# Altium PCB VA_HUB_PCB.PcbDoc (part 12 of 12)
Units mil, origin at the board's own origin, x right, y up, seen from the top; angles counter-clockwise.
Board outline 4408 x 3619 mil, 8 copper layers (Top Layer, Routing 1, Routing 2, Power Plane, GND Plane, Routing 3, Routing 4, Bottom Layer), stack 85.156 mil thick; 569 components, 440 nets, 2911 pads, 1518 vias.
Unrouted connection lines stored in the file: 46.
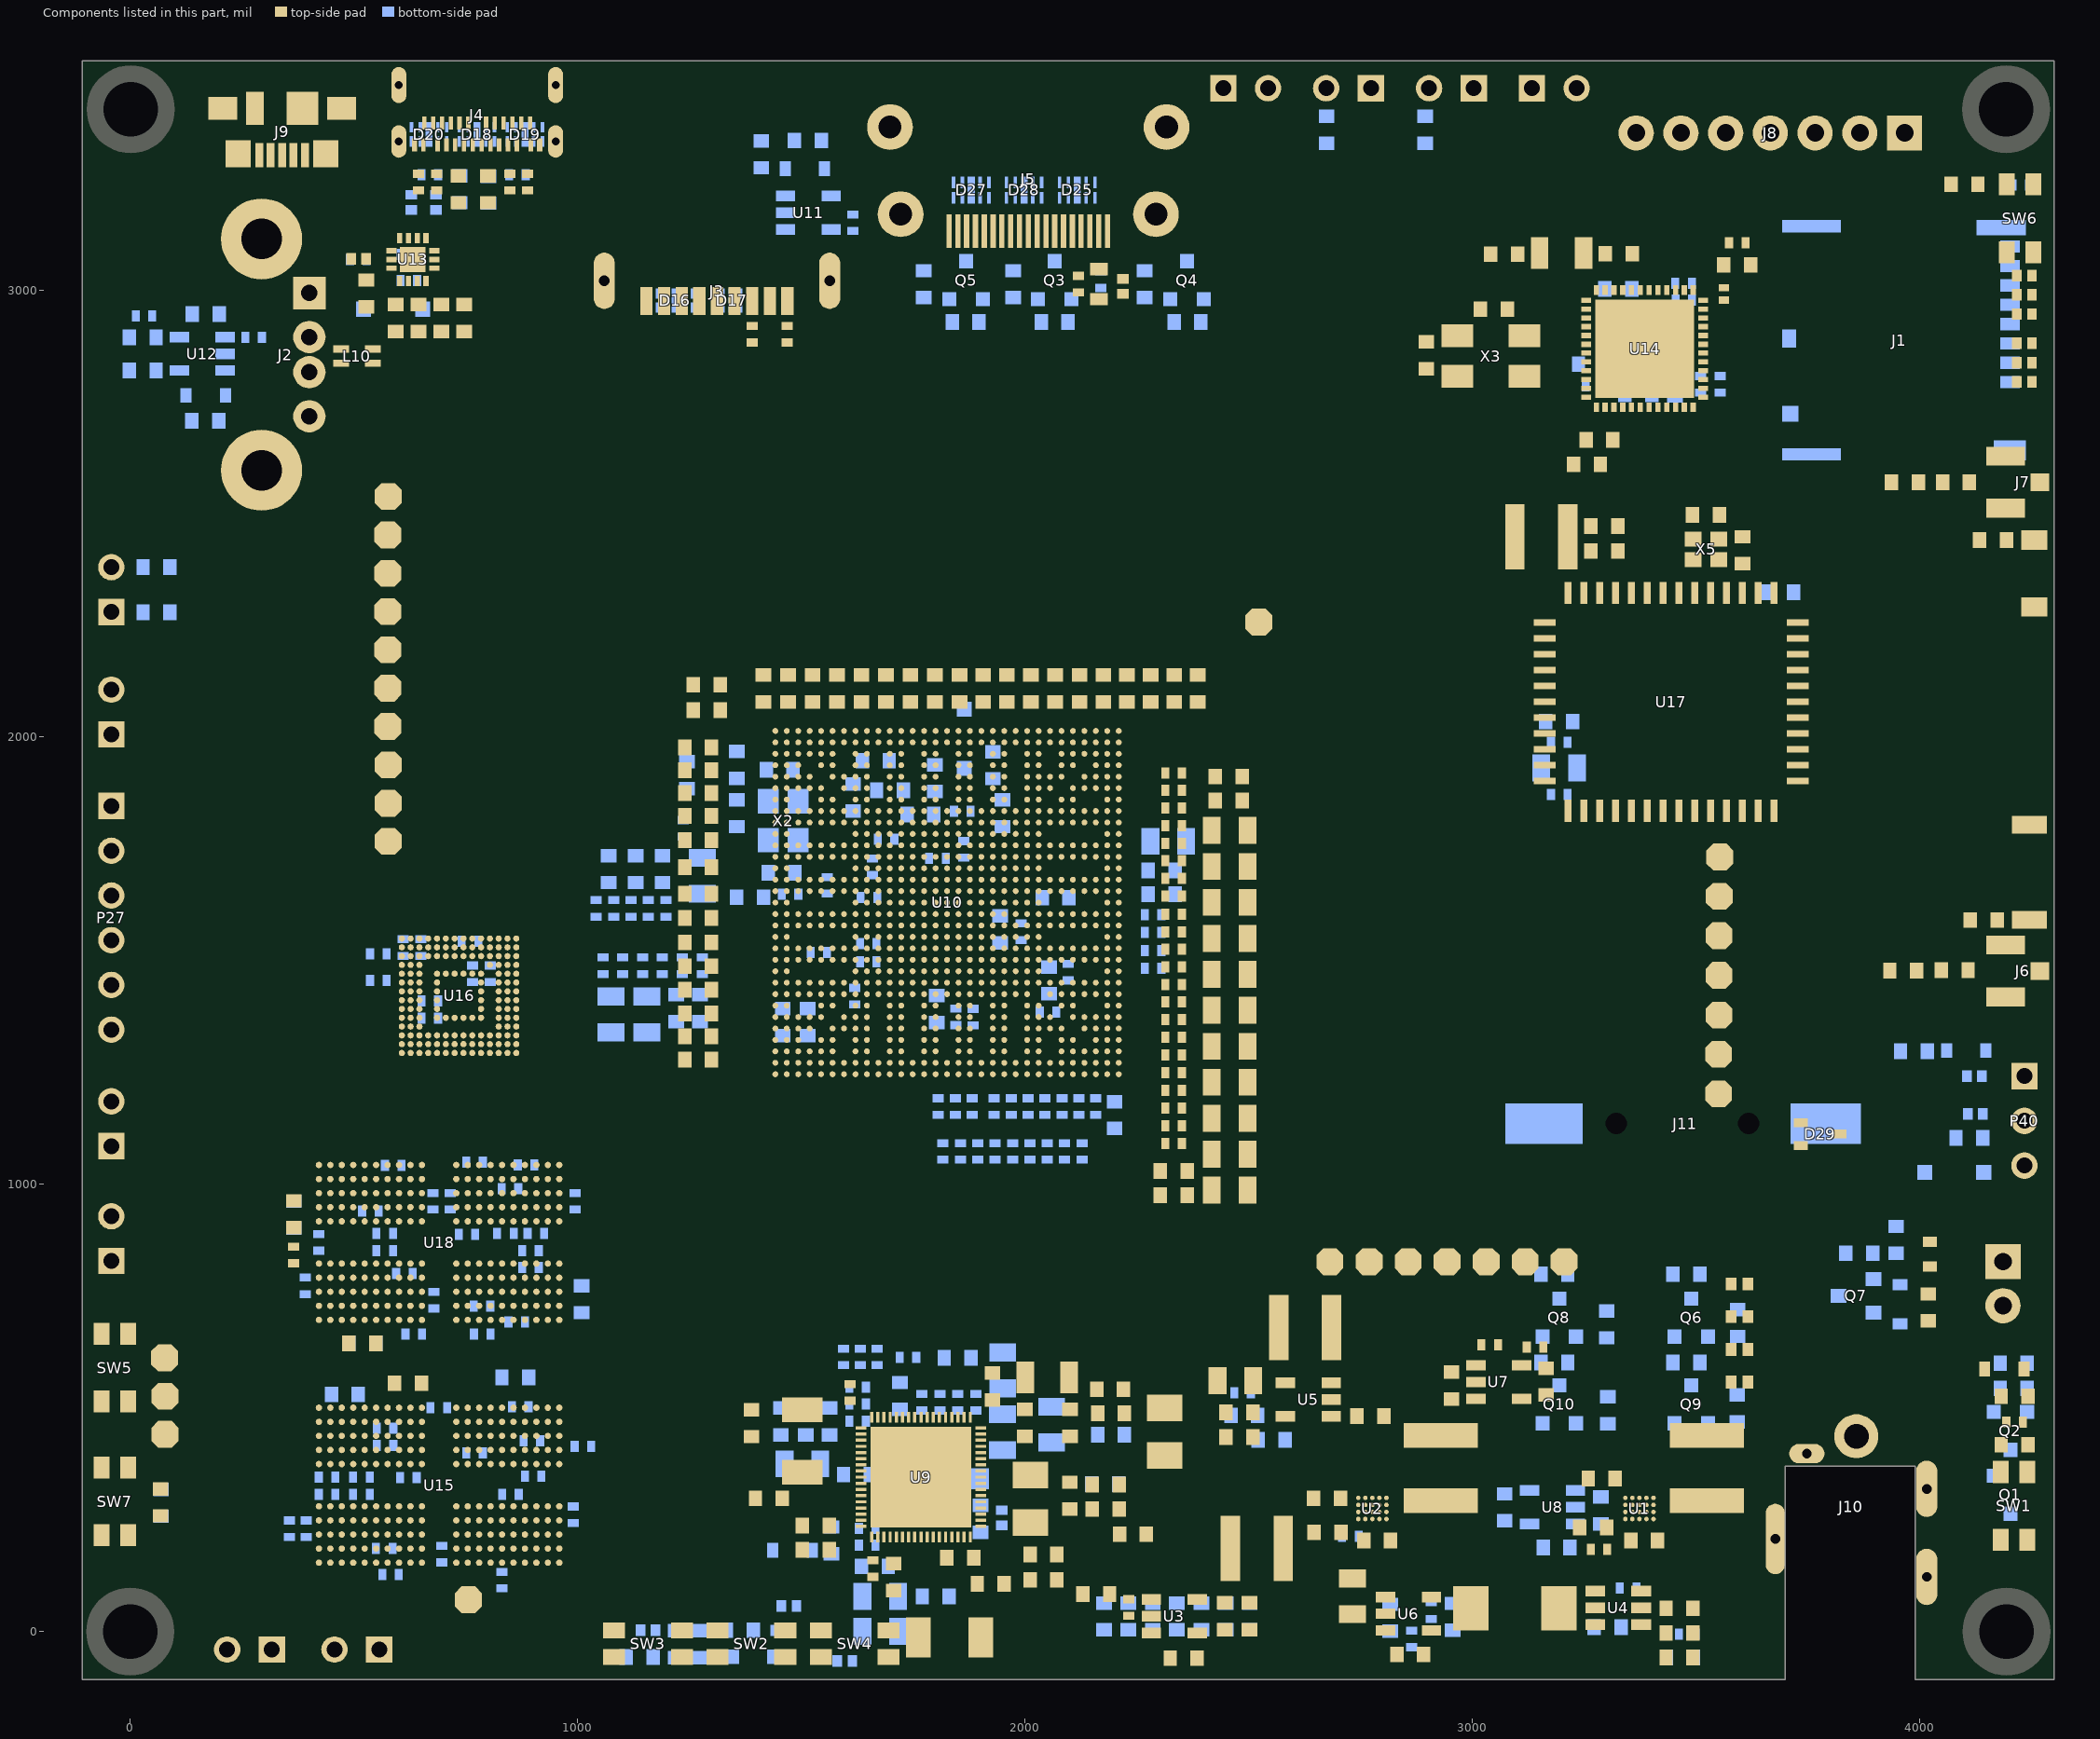
[diagram p15: the components of this part, seen from the top]

## Silkscreen, mask and mechanical layers (free items; w line width, h text height)
Top Overlay:
  drawing of 3067 lines, arcs and shapes, not listed
  text "DSP" at 2390.49,3335.99 h55
  text "BOOT1_" at 2621.16,3335.99 h55
  text "BOOT0_" at 2849.82,3335.99 h55
  text "DEBUG" at 3081.82,3335.99 h60
  text "#" at 4054.82,3268.41 h55
  text "DATA" at 3316.32,3239.99 h60
  text "*" at 612.38,3181.09 h65 r270
  text "*" at 652.38,3181.09 h65 r270
  text "*" at 815.82,3180.92 h65 r270
  text "*" at 856.56,3181 h65 r270
  text "$" at 3631,3093.41 h38
  text "*" at 2087.17,2954.1 h65 r270
  text "*" at 1358.56,2842 h65 r270
  text "*" at 1436.56,2842 h65 r270
  text "#" at 3200.82,2646.41 h55
  text "#" at 3172.82,2592.41 h55
  text "VCC_EFUSE" at 617.3,2509 h60
  text "VCC_1V8" at 616.2,2422.82 h60
  text "#" at 3355.41,2397.43 h55
  text "ZERO CARBON FOOTPRINT" at 1713,2374 h35
  text "MCU_JTAG" at 12.61,2372.59 h60
  text "NetP34_1" at 616.46,2334.82 h60
  text "NetP35_1" at 617.67,2247.82 h60
  text "DDR0_OTD1" at 2561.64,2228.18 h60
  text "VCCA1V8_HDMI" at 617.39,2166.82 h60
  text "DFT_JTAG" at 13.6,2098.84 h60
  text "VCCA0V9_HDMI" at 617.39,2079.82 h60
  text "VCC_3V0" at 617.45,1992.82 h60
  text "SDMMC0_DET_L" at 618.34,1909.82 h60
  text "$" at 2278.82,1908.24 h38
  text "*" at 2251.51,1869.94 h65 r270
  text "SPI_HEADER" at 13.27,1838.73 h60
  text "*" at 2251.51,1830.94 h65 r270
  text "VDD_CPU_L" at 618.09,1822.82 h60
  text "*" at 2251.51,1790.94 h65 r270
  text "@" at 2530,1777.29 h60
  text "*" at 2251.51,1751.94 h65 r270
  text "VCC_DDR" at 618.45,1737.82 h60
  text "*" at 2251.51,1712.94 h65 r270
  text "VCC_3V3_SYS" at 3128.97,1702.53 h60
  text "@" at 2530,1696.29 h60
  text "*" at 2251.51,1673.94 h65 r270
  text "*" at 2251.51,1634.94 h65 r270
  text "@" at 2530,1616.29 h60
  text "VCC_1V8" at 3226.26,1614.53 h60
  text "*" at 2251.51,1592.94 h65 r270
  text "#" at 1211.71,1557.7 h55 r180
  text "*" at 2251.51,1553.94 h65 r270
  text "@" at 2530,1534.29 h60
  text "VCC_5V" at 3225.49,1525.82 h60
  text "*" at 2251.51,1514.94 h65 r270
  text "$" at 2278.82,1474.24 h38
  text "@" at 2530,1453.29 h60
  text "VDD_CENTER" at 3137.09,1438.82 h60
  text "*" at 2251.51,1435.94 h65 r270
  text "*" at 2251.51,1396.94 h65 r270
  text "@" at 2530,1373.29 h60
  text "*" at 2251.38,1357.82 h65 r270
  text "VDD_LOG" at 3225.26,1347.53 h60
  text "*" at 2251.25,1317.89 h65 r270
  text "@" at 2530,1293.29 h60
  text "*" at 2251.25,1278.89 h65 r270
  text "VDD_CPU_B" at 3176.65,1263.82 h60
  text "*" at 2251.25,1238.89 h65 r270
  text "UART_DEBUG" at 3806.06,1233.82 h60
  text "@" at 2530,1213.29 h60
  text "$" at 2278.82,1198.24 h38
  text "AP_JTAG" at 12.7,1179.36 h60
  text "NetP32_1" at 3226.67,1170 h60
  text "*" at 2251.51,1159.94 h65 r270
  text "@" at 2530,1132.29 h60
  text "*" at 2251.25,1119.89 h65 r270
  text "@" at 2530,1051.29 h60
  text "@" at 2530,970.29 h60
  text "FAN" at 4049.82,930.74 h60
  text "DFT_JTAG" at 12.6,922.34 h60
  text "DDR1_OTD1" at 2798.82,866.64 h60 r90
  text "VCCA_0V9" at 2973.1,867.14 h60 r90
  text "VCC_RTC" at 3147.81,866.5 h60 r90
  text "VCC3V3_S5" at 3234.82,866.47 h60 r90
  text "VCCA3V0_CODEC" at 2885.82,865.64 h60 r90
  text "VDD_GPU" at 3063.1,866.26 h60 r90
  text "DDR0_OTD0" at 2710.82,863.66 h60 r90
  text "GPIO-A1" at 3323.01,748.25 h60
  text "RED" at 3323.82,679.67 h60
  text "$" at 3076.9,629.44 h38
  text "$" at 3178.11,623.78 h38
  text "WORK" at 3323.52,606.82 h60
  text "#" at 1894.82,604.23 h55 r180
  text "#" at 2203.41,599.82 h55 r270
  text "DDR1_ODT0" at 115.83,583.42 h60
  text "$" at 1594.46,575.02 h38
  text "YELLOW" at 3317.32,531.82 h60
  text "EMC_CLK" at 116.32,497 h60
  text "*" at 4131.89,456.2 h65 r270
  text "GND" at 117.46,415 h60
  text "#" at 3211.82,248.23 h55 r180
  text "#" at 2656.82,189.23 h55 r180
  text "#" at 1798.56,181.79 h55 r180
  text "*" at 3208.38,171.82 h65 r270
  text "#" at 3509,120.41 h55 r180
  text "*" at 1594.56,113 h65 r270
  text "#" at 2205.82,51.23 h55 r180
  text "BOOT_0" at 157.77,14.56 h60
  text "BOOT_1" at 397.82,14.56 h60
  text "#" at 3549.1,14.99 h55 r180
  text "*" at 2201.38,-6.18 h65 r270
  text "DDR0_ODT0" at 709.83,-29 h60
Bottom Overlay:
  drawing of 3082 lines, arcs and shapes, not listed
  text "#" at 2661.82,3263.41 h55
  text "#" at 2882.82,3263.41 h55
  text "*" at 947.27,3247.82 h65 r90
  text "*" at 652.27,3246.82 h65 r90
  text "*" at 4210,3221.26 h65 r90
  text "*" at 1649.44,3186 h65 r90
  text "$" at 676,3068.41 h38
  text "*" at 561.27,3022.82 h65 r90
  text "$" at 676,3009.41 h38
  text "*" at 3456,3005.26 h65 r90
  text "$" at 2208,2996.41 h38
  text "#" at 3240.92,2982.94 h55
  text "*" at 3456.27,2965.82 h65 r90
  text "$" at 84,2930.41 h38
  text "*" at 357.44,2884 h65 r90
  text "*" at 3329.27,2878.82 h65 r90
  text "*" at 3256,2775.26 h65 r90
  text "*" at 3586,2729.26 h65 r90
  text "$" at 3519,2725.41 h38
  text "#" at 3324.82,2698.41 h55
  text "ZERO CARBON FOOTPRINT" at 2743,2288 h35
  text "Note:" at 4275.5,2214.1 h70
  text "*>> 0.1UF 0402 10V" at 4280.5,2132.9 h75
  text "$>> 1UF 0402" at 4280.5,2052.4 h75
  text "*" at 3276.27,1979.82 h65 r90
  text "#" at 1258,1976.59 h55
  text "#>> 10K 0603" at 4280.5,1971.9 h75
  text "#" at 1583,1965.41 h55 r180
  text "@>> 22uF 0603" at 4280.5,1890.87 h75
  text "*" at 3276.27,1862.82 h65 r90
  text "*" at 1874.44,1858 h65 r90
  text "*" at 1270.27,1831.82 h65 r90
  text "#" at 1583.37,1818.39 h55
  text "*" at 1771.44,1760 h65 r90
  text "*" at 1590.52,1705.86 h65 r90
  text "*" at 1896.48,1689.1 h65 r90
  text "*" at 1855.44,1683 h65 r90
  text "*" at 1657.52,1681.86 h65 r90
  text "*" at 1733.44,1628 h65 r90
  text "*" at 1489.44,1604 h65 r90
  text "*" at 2366.44,1592 h65 r90
  text "$" at 1020.82,1590.24 h38
  text "*" at 1113.27,1560.82 h65 r90
  text "*" at 1153.14,1560.94 h65 r90
  text "*" at 1191.14,1560.94 h65 r90
  text "*" at 1230.14,1560.94 h65 r90
  text "*" at 2366.44,1552 h65 r90
  text "$" at 2029.82,1538.24 h38
  text "$" at 813,1532.41 h38
  text "*" at 1634.61,1525.82 h65 r90
  text "$" at 1197.82,1525.24 h38
  text "*" at 1089.27,1523.82 h65 r90
  text "*" at 1133.14,1523.82 h65 r90
  text "*" at 1178.11,1523.82 h65 r90
  text "*" at 1267.14,1523.94 h65 r90
  text "*" at 1311.14,1523.94 h65 r90
  text "*" at 2366.44,1512 h65 r90
  text "*" at 1634.61,1488.5 h65 r90
  text "*" at 2366.44,1473 h65 r90
  text "COIN CELL HOLDER" at 3863,1433.8 h75
  text "*" at 2133.44,1375 h65 r90
  text "*" at 1652.27,1362.82 h65 r90
  text "#" at 4031.82,1331.41 h55
  text "*" at 1891.81,1314.6 h65 r90
  text "*" at 1849.48,1114.1 h65 r90
  text "*" at 1886.48,1114.1 h65 r90
  text "*" at 1926.27,1114.1 h65 r90
  text "*" at 2002.27,1114.1 h65 r90
  text "*" at 2040.27,1114.1 h65 r90
  text "*" at 2077.14,1114.1 h65 r90
  text "*" at 2115.14,1114.1 h65 r90
  text "*" at 2153.14,1114.1 h65 r90
  text "*" at 2191.14,1114.1 h65 r90
  text "*" at 1920.82,1092.01 h65
  text "*" at 1850.44,1013 h65 r90
  text "*" at 1889.44,1013 h65 r90
  text "*" at 1928.44,1013 h65 r90
  text "*" at 1967.44,1013 h65 r90
  text "*" at 2006.44,1013 h65 r90
  text "*" at 2045.44,1013 h65 r90
  text "*" at 2084.44,1013 h65 r90
  text "*" at 2122.57,1013 h65 r90
  text "*" at 2161.44,1013 h65 r90
  text "#" at 3932.08,969.14 h55 r180
  text "#" at 3305.51,780.89 h55 r180
  text "$" at 1603,654.41 h38
  text "$" at 1638,654.41 h38
  text "$" at 1675,654.41 h38
  text "#" at 4154.79,618.07 h55 r180
  text "#" at 3309.51,589.89 h55 r180
  text "$" at 1662.32,535.74 h38
  text "*" at 2568.44,527 h65 r90
  text "$" at 1661.91,496.74 h38
  text "#" at 3652.51,487.89 h55 r180
  text "$" at 1781.41,477.82 h38 r90
  text "$" at 1861.91,477.82 h38 r90
  text "$" at 1902,477.62 h38 r90
  text "*" at 2751.44,474 h65 r90
  text "$" at 1662.32,458.74 h38
  text "*" at 1842.44,459 h65 r90
  text "#" at 2251.08,455.79 h55 r180
  text "#" at 3310,365.41 h55 r180
  text "#" at 83.18,230.23 h55 r180
  text "$" at 1699.82,220.24 h38
  text "*" at 2710.27,202.82 h65 r90
  text "$" at 1699.82,181.24 h38
  text "#" at 1721.82,128.41 h55
  text "#" at 2828.82,125.23 h55 r180
  text "#" at 1858.81,96.44 h55 r180
  text "#" at 1285.84,65.39 h55 r180
  text "*" at 2905.44,55 h65 r90
  text "*" at 3562.44,-20 h65 r90
  text "*" at 2931.44,-45 h65 r90
Board Outline:
  lines w10: -107.18,3511.82 4300.82,3511.82 4300.82,-107.18 3990.82,-107.18 3990.82,369.82 3699.57,369.82 3699.57,-107.18 -107.18,-107.18 -107.18,3531.82
Drill Drawing:
  rectangle: 1621,1455 1643,1549

## Dimensions
-107.18,-107.18 to -107.18,3531.82 on Dimension
-107.18,-107.18 to 4300.82,-107.18 on Dimension

## Text inside footprints (layer, text, board x,y; h text height)
J2: Top Overlay "Board Edge" at -12.99,3018.16 h31.5 r270
J3: Top Overlay "Board Edge" at 1505,3398.88 h39.37 r180
J8: Top Overlay "Board Edge" at 3814.82,3461.82 h30 r180
J9: Top Overlay "Board Edge" at 445.55,3500.16 h20 r180
J10: Top Overlay "Board Edge" at 3722.66,-18.35 h23.62